# Altium PCB OmniCore_SDR.PcbDoc (part 10 of 13)
Units mil, origin at the board's own origin, x right, y up, seen from the top; angles counter-clockwise.
Board outline 4724.72 x 2755.91 mil, 8 copper layers (Top, GND 1, Layer 1, Layer 2, GND 2, Layer 3, Power, Bottom), stack 40.468 mil thick; 530 components, 427 nets, 2315 pads, 1715 vias.
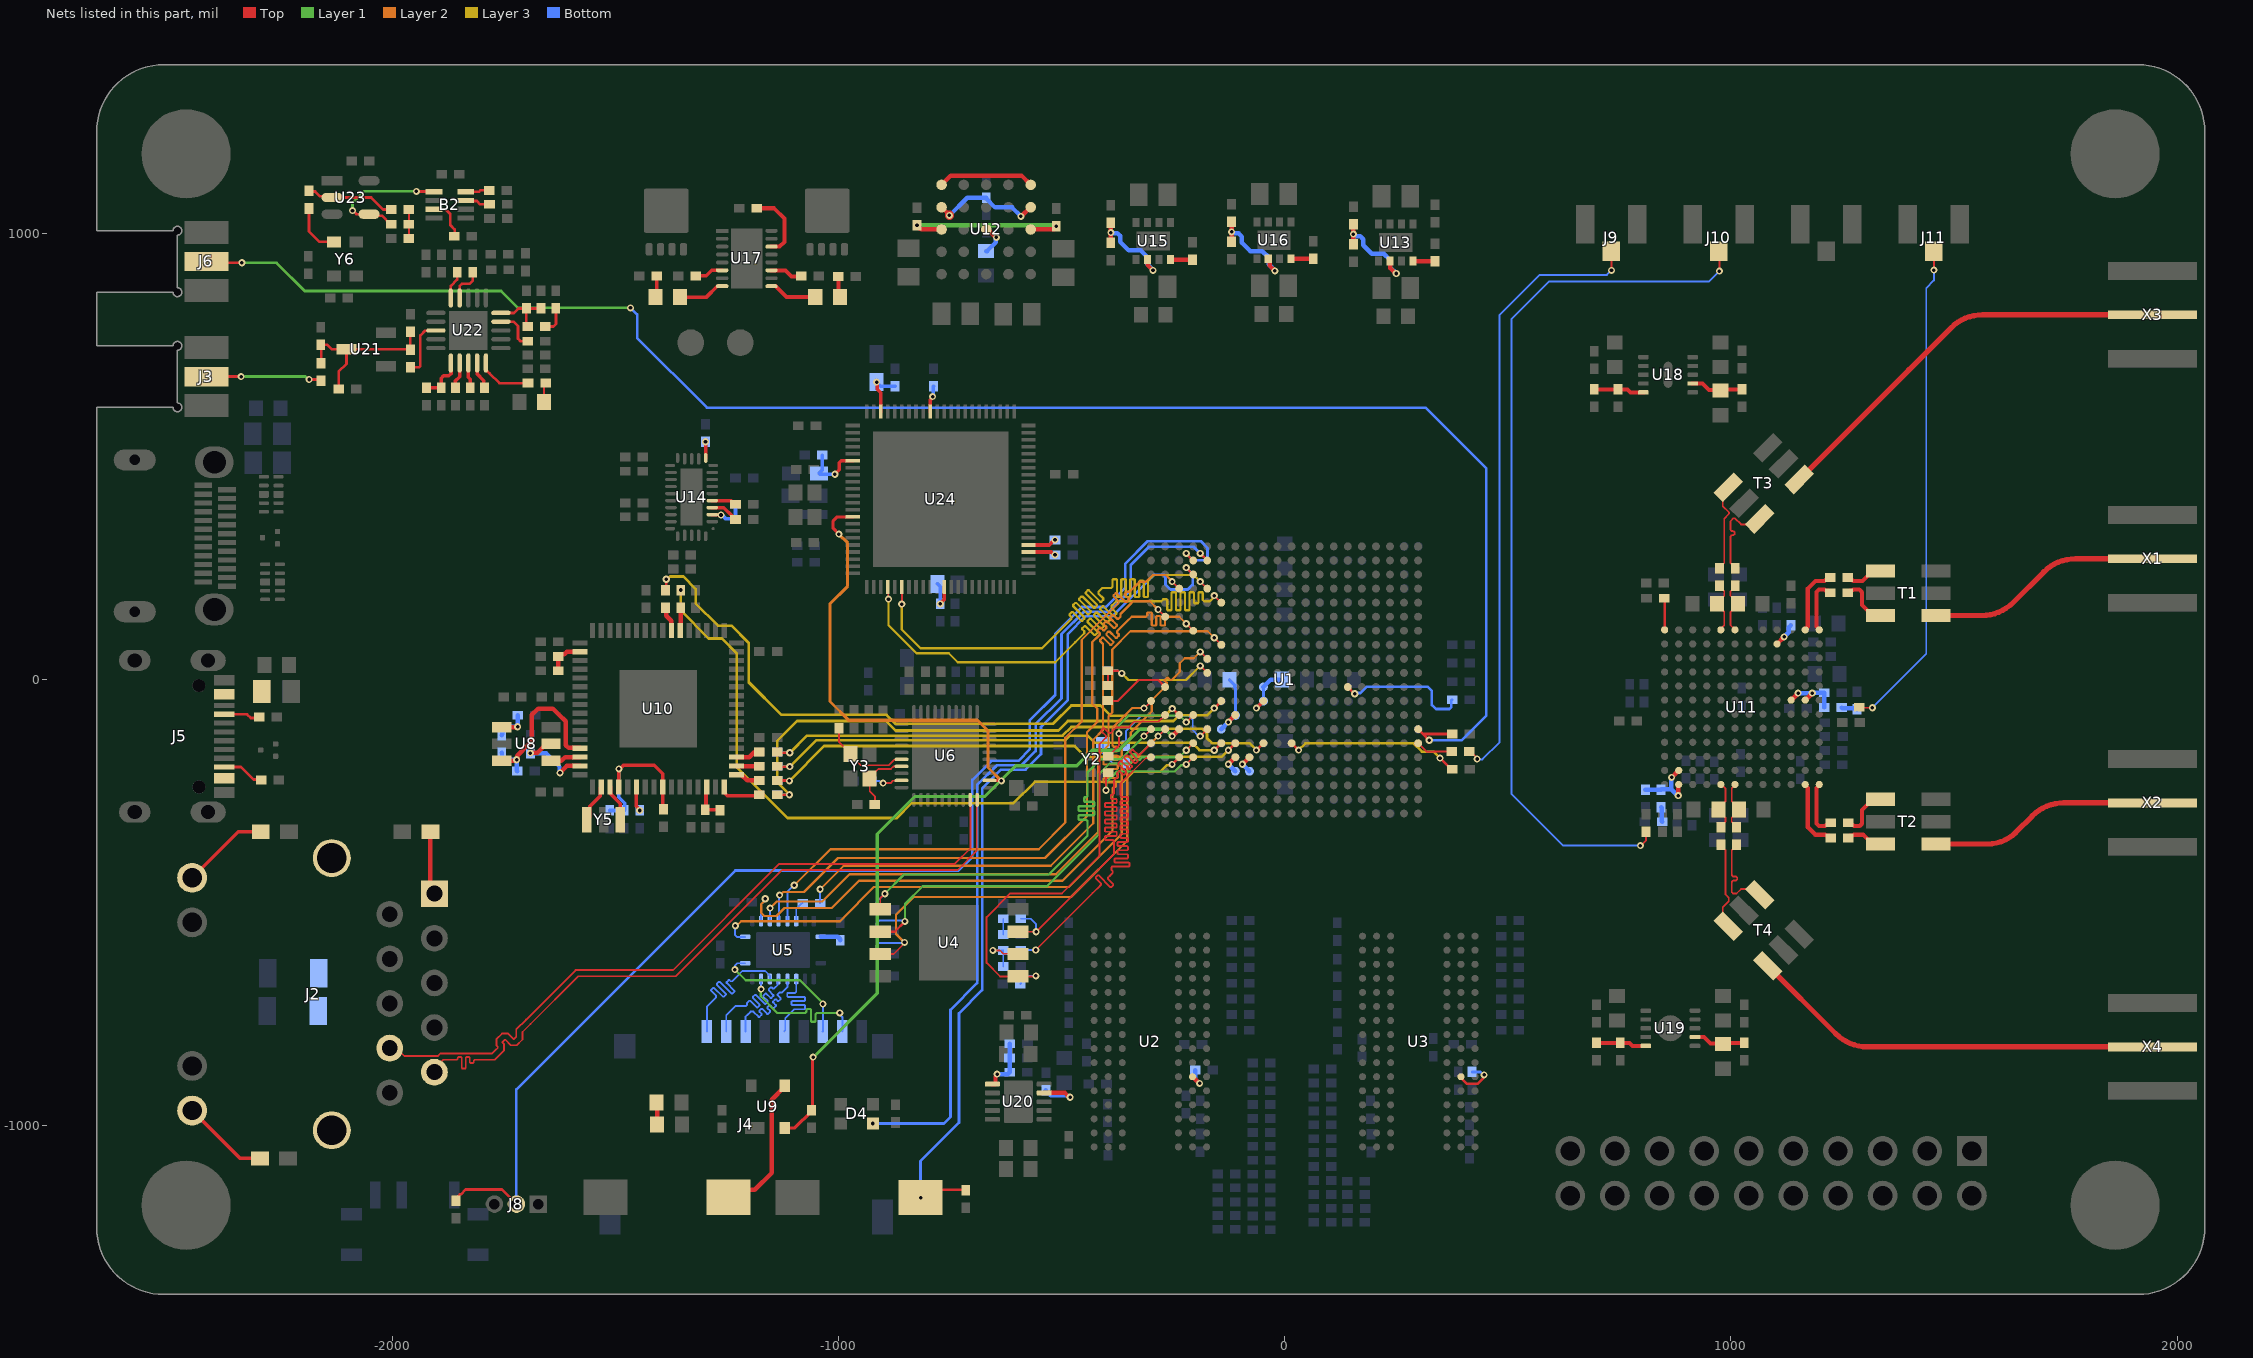
[diagram p15: the nets of this part, all layers, seen from the top]

## Via types
v1: diameter 16, hole 8, Top to Bottom, tented both sides, 1667 vias
v2: diameter 19.68, hole 7.87, Top to Bottom, 44 vias
v3: diameter 200, hole 125, Top to Bottom, 4 vias

## Nets (pads, with @x,y where several pads share a name; then routed paths per layer and width w, separated by ;. In a path a pad name is that pad's centre, name@x,y a point inside that pad or via, vN(x,y) a via of type N, cw(c..) or ccw(c..) an arc to the next point about the centre after c; other vN are vias at no path point) (continued)
MDI3_N: J2.9 U6.10 | length 1646
  Top w4: J2.9@-1905.55,-879.8 -1905.55,-871.4 -1885.95,-851.8 -1871,-851.8 -1857.5,-851.8 -1855.5,-851.8 -1853.15,-849.46 -1853.15,-847.15 -1851.8,-845.8 -1845.5,-845.8 -1844.15,-847.15 -1844.15,-870.45 -1842.8,-871.8 -1836.5,-871.8 -1835.15,-870.45 -1835.15,-847.15 -1833.8,-845.8 -1827.5,-845.8 -1826.15,-847.15 -1826.15,-857.94 -1824.8,-859.29 -1818.5,-859.29 -1817.15,-857.94 -1817.15,-854.14 -1814.81,-851.8 -1795.62,-851.8 -1770,-851.8 -1758.1,-839.9 -1749.69,-831.48 -1749.69,-816.57 -1752.58,-813.68 -1752.58,-811.77 -1748.12,-807.32 -1746.21,-807.32 -1734.21,-819.32 -1720.7,-819.32 -1708.05,-806.67 -1708.05,-793.16 -1708.05,-789.85 -1690.1,-771.9 -1583.2,-665 -1365,-665 -1127,-427 -733.2,-427 -690,-383.8 -690,-284.85 -689.84,-284.69 -689.84,-270.14 U6.10@-689.1,-269.4
MDI3_P: J2.8 U6.9 | length 1646.3
  Top w4: J2.8@-2005.55,-825.9 -1990.43,-825.9 -1972.53,-843.8 -1897.75,-843.8 -1891.75,-837.8 -1775.8,-837.8 -1768,-830 -1763.69,-825.69 -1763.69,-822.37 -1766.58,-819.48 -1766.58,-805.97 -1753.92,-793.32 -1740.41,-793.32 -1728.41,-805.32 -1726.5,-805.32 -1722.05,-800.87 -1722.05,-798.96 -1722.05,-784.05 -1700,-762 -1589,-651 -1370.8,-651 -1132.8,-413 -739,-413 -704,-378 -704,-284.85 -704.16,-284.69 -704.16,-270.14 U6.9@-704.9,-269.4
MIO7: R17.1 U1.D8 | length 267.4
  Top w4.2: R17.1@-395.32,-172 -371.39,-148.08 v1(-371.39,-121.07) ; v1(-220.72,-95.28) U1.D8@-204.97,-79.53
  Layer 1 w5: v1(-371.39,-121.07) -371.39,-102.39 -349.78,-80.78 -235.22,-80.78 v1(-220.72,-95.28)
MIO8: R9.1 U1.D5 | length 277.4
  Top w4.2: v1(-400.39,-248) -400.39,-214.08 R9.1@-395.32,-209 ; v1(-220.72,-190) -220.72,-189.88 -204.97,-174.13 U1.D5@-204.97,-174.02
  Layer 1 w5: v1(-400.39,-248) -400,-247.61 -400,-230.34 -375.66,-206 -246.43,-206 -232.54,-192.1 -222.82,-192.1 v1(-220.72,-190)
NetB2_1: B2.1 R138.2 U23.4 | length 310.5
  Top w4.2: v1(-1946,1094) v1@-1945.7,1093.7 ; B2.1@-1906.51,1093.7 B2.1@-1906.21,1093.4
  Top w6: v1(-2089,1051) -2087.98,1051 -2079.92,1042.94 U23.4@-2051.99,1042.94 -2048.78,1039.74 -2023.39,1039.74 -2004,1020.35 R138.2@-2002.03,1020.35 ; v1@-1945.7,1093.7 B2.1@-1906.51,1093.7
  Layer 1 w6: v1(-2089,1051) -2089,1068 -2063,1094 v1(-1946,1094)
NetB2_3: B2.3 R142.1 | length 94.9
  Top w6: B2.3@-1906.21,1054.03 -1881.03,1054.03 -1870,1043 -1870,1019 -1860,1009 -1860,994.06 R142.1@-1860.72,993.35
NetB2_7: B2.7 R141.2 | length 57.1
  Top w6: B2.7@-1835.35,1073.72 -1833.98,1072.35 -1810.35,1072.35 -1803,1065 -1782.38,1065 R141.2@-1782.03,1065.35
NetB2_8: B2.8 R140.2 | length 53.5
  Top w6: B2.8@-1835.35,1093.4 -1805.6,1093.4 -1802.65,1096.35 R140.2@-1783.03,1096.35
NetC4_2: C4.2 R6.2 R7.2 U1.E11 | length 317.4
  Top w4.2: v1(-189.22,30.71) U1.E11@-173.47,14.96
  Top w5: R6.2@-396,-13 C4.2@-396,20 -373.98,20 -367.98,14 v1(-365,14)
  Layer 3 w5: v1(-365,14) -350,-1 -220.93,-1 v1(-189.22,30.71)
  Bottom w5: R7.2@-396,20 -373.98,20 -367.98,14 v1(-365,14)
NetC36_2: C36.2 C37.2 L1.1 U1.G8 | length 152.4
  Top w10: v1(-126.23,-95.28) U1.G8@-110.48,-79.53
  Bottom w7: L1.1@-124.04,-0.5 -111.79,-12.75 -111.79,-17.12 -110.1,-18.82 C36.2@-110.1,-80
  Bottom w10: C37.2@-142.1,-111 -142.03,-111 -126.3,-95.28 v1(-126.23,-95.28) -125.7,-95.28 -110.43,-80 C36.2@-110.1,-80
NetC38_2: C38.2 C39.2 L2.1 U1.J9 | length 125.1
  Top w10: v1(-63.24,-63.78) U1.J9@-47.49,-48.03
  Bottom w7: C39.2@-47.7,-16.6 -47.6,-16.7 -47.6,-47.92 C38.2@-47.5,-48
  Bottom w10: v1(-63.24,-63.78) C38.2@-47.5,-48 ; C39.2@-47.7,-16.6 -31.1,0 L2.1@-5.56,0
NetC58_1: C58.1 U6.37 Y3.1 | length 146.9
  Top w4.2: C58.1@-918.32,-280 -918.32,-261.68 -930,-250 -930,-220.03 -910.33,-200.36 -882.36,-200.36 -876.6,-194.6 U6.37@-858.4,-194.6
NetC61_2: C61.2 U6.36 Y3.3 | length 200.7
  Top w4.2: C61.2@-999,-108.69 -999,-139.21 -973.3,-164.91 Y3.3@-973.3,-166.88 -973.3,-168.85 -950.15,-192 -887,-192 -874.6,-179.6 -859.1,-179.6 U6.36@-858.4,-178.9
NetC135_1: C135.1 U24.49 | length 64.2
  Top w8: U24.49@-574.2,301.6 -527.56,301.6 -516.16,313 v1(-514.68,313)
NetC142_1: C142.1 J2.1 | length 142.5
  Top w10: C142.1@-1914.5,-341 -1914.5,-470.84 J2.1@-1905.55,-479.8
NetC149_1: C149.1 U24.48 | length 50.4
  Top w8: U24.48@-562.45,285.94 -523.22,285.94 -516.85,279.57 v1(-514.68,279.57)
NetC156_2: C156.2 C157.2 U24.34 | length 88.5
  Top w8: v1(-772,169.69) -772,170.65 -763.2,179.45 U24.34@-763.2,207.2
  Bottom w8: C157.2@-778,214.5 -772,208.5 v1(-772,169.69)
NetC158_1: C158.1 U24.79 | length 59.7
  Top w8: U24.79@-794.7,600.8 -794.7,626.14 -789,631.84 v1(-789,634)
  Bottom w8: v1(-789,634) -788,635 -788,656.32 C158.1@-787,657.32
NetC159_1: C159.1 C160.1 U24.86 | length 114.9
  Top w8: v1(-914.5,666.5) -912.97,664.97 -912.97,650.58 -904.9,642.5 U24.86@-904.9,600.8
  Bottom w8: v1(-914.5,666.5) -905.32,657.32 C159.1@-873.09,657.32
NetC164_2: C164.2 C169.2 U24.6 | length 142.5
  Top w8: v1(-1008,460) -998,470 -998,485.91 -993.31,490.6 U24.6@-967.9,490.6
  Bottom w8: C164.2@-1036,503 -1036,469.5 C169.2@-1043.5,462 -1041.5,460 v1(-1008,460)
NetC166_1: C166.1 R30.1 R59.2 U20.1 | length 124.8
  Top w10: U20.1@-655.07,-906.63 -648.57,-906.63 -648.06,-906.12 -648.06,-889.36 -644.31,-885.61 v1(-644.31,-883.99)
  Bottom w10: v1(-644.31,-883.99) -620.36,-883.99 C166.1@-616.37,-880 -616.03,-879.66 -616.03,-816.34 R30.1@-615.68,-816
NetC177_2: C177.2 R90.1 U10.50 | length 85.3
  Top w10: C177.2@-1627.65,20 R90.1@-1627.65,52 -1622.81,56.84 -1614.16,56.84 -1608.52,62.48 U10.50@-1578.73,62.48
NetC186_2: C186.2 R107.1 U10.14 | length 85.3
  Top w8: U10.14@-1295.27,-240.67 -1296.8,-242.2 -1296.8,-289.78 C186.2@-1298.34,-291.31 -1297.84,-291.81 -1265.84,-291.81 R107.1@-1265.34,-292.32
NetC196_2: C196.2 C197.1 R113.1 U10.4 U10.9 | length 358.2
  Top w8: U10.4@-1492.12,-240.67 -1492.06,-240.61 -1492.06,-200.06 v1(-1492,-200) -1489.84,-200 -1481.84,-192 -1413,-192 -1393.69,-211.31 U10.9@-1393.69,-240.67 -1393.69,-286.96 C197.1@-1393,-287.65
  Bottom w8: R113.1@-1512.34,-293.32 C196.2@-1480.34,-293.31 -1479,-291.98 -1479,-277 -1492,-264 v1(-1492,-200)
NetC199_1: C199.1 U11.M12 | length 71.6
  Top w4.2: C199.1@850.18,182.46 C199.1@851.51,181.13
  Top w6: U11.M12@851.51,111.44 C199.1@851.51,181.13
NetC200_2: C200.2 R116.2 | length 35.8
  Bottom w10: R116.2@1248.18,-62.54 1250.02,-64.39 1280.65,-64.39 C200.2@1282.5,-66.23
NetC201_2: C201.2 R116.1 U11.G2 U11.G3 | length 135.9
  Top w10: U11.G3@1134.98,-46.04 v1(1150.72,-30.29) ; U11.G2@1166.47,-46.04 v1(1182.22,-30.29)
  Bottom w10: v1(1150.72,-30.29) v1(1182.22,-30.29) 1182.59,-29.92 1208.44,-29.92 C201.2@1208.81,-29.54 R116.1@1208.81,-62.54
NetC202_2: C202.2 R117.2 | length 33.4
  Bottom w10: R117.2@843.5,-286.23 844.84,-287.57 844.84,-317.2 C202.2@846.18,-318.54
NetC203_2: C203.2 R117.1 U11.A11 U11.B11 | length 154.5
  Top w10: v1(867.26,-219.27) U11.B11@883.01,-203.52 ; v1(882,-260) 882.5,-259.5 882.5,-235.52 U11.A11@883.01,-235.02
  Bottom w10: C203.2@808.5,-246.86 R117.1@843.5,-246.86 844.45,-245.9 866.28,-245.9 880.38,-260 v1(882,-260) ; 866.11,-245.9 866.11,-220.42 v1(867.26,-219.27)
NetC233_1: C233.1 J2.15 J2.16 R145.2
NetC239_2: C239.2 U13.8 | length 49.8
  Top w10: U13.8@287.39,938.03 287.56,937.86 336.83,937.86 C239.2@337,937.69
NetC242_1: C242.1 U12.C3 | length 71.8
  Top w10: U12.C3@-669,1008.69 -665.31,1008.69 -648.78,992.15 -647.15,992.15 v1(-646,991)
  Bottom w10: C242.1@-669,960.24 -667.03,960.24 -647.15,980.13 -647.15,989.85 v1(-646,991)
NetC243_2: C243.2 C246.2 U12.A3 U12.E3 | length 434.3
  Top w10: v1(-824,1018.31) -824,1016.35 -819.16,1011.5 -817.19,1011.5 -814.37,1008.69 U12.A3@-769,1008.69 ; U12.E3@-569,1008.69 -519.63,1008.69 -518.81,1009.5 -516.84,1009.5 -512,1014.35 v1(-512,1016.31)
  Layer 1 w10: v1(-824,1018.31) -522.7,1018.31 -520.7,1016.31 v1(-512,1016.31)
NetC249_2: C249.2 U15.8 | length 49.8
  Top w10: U15.8@-256.17,941.35 -256,941.17 -206.73,941.17 C249.2@-206.56,941
NetC250_2: C250.2 U16.8 | length 49.8
  Top w10: U16.8@14.39,943.03 14.56,942.86 63.83,942.86 C250.2@64,942.69
NetC251_1: C251.1 U17.14 | length 156.9
  Top w9: C251.1@-1182.79,1056.27 -1144.27,1056.27 -1121,1033 -1121,981 -1131.61,970.39 -1149.88,970.39 U17.14@-1150,970.27
NetC252_1: C252.1 U17.11 | length 73.2
  Top w9: U17.11@-1150,917.12 -1119.12,917.12 -1105,903 -1084.43,903 C252.1@-1083.16,904.27
NetC255_2: C255.2 R84.1 U18.7 | length 118.4
  Top w9: U18.7@914.3,663.44 936.26,663.44 950.83,648.88 975.39,648.88 C255.2@976.77,647.49 979.9,650.62 R84.1@1024.77,650.62
NetC260_2: C260.2 R87.1 U19.7 | length 118.4
  Top w9: U19.7@919.51,-801.09 940.09,-801.09 954,-815 979.95,-815 C260.2@981.98,-817.04 985.11,-813.91 R87.1@1029.98,-813.91
NetC261_1: C261.1 U17.6 | length 64.6
  Top w8: C261.1@-1319.79,904.27 -1319.04,905.02 -1295.98,905.02 -1284.03,916.97 -1260.62,916.97 U17.6@-1260.48,917.12
NetC274_1: C274.1 J3.1 | length 263.8
  Top w6: J3.1@-2416.46,679.02 -2338.62,679.02 v1@-2338.54,679.09 ; v1@-2189.11,672.5 v1(-2186.4,672.5) -2162.18,672.5 C274.1@-2159.35,669.66
  Layer 1 w6: v1(-2338.62,679.09) -2194.91,679.09 -2188.32,672.5 v1(-2186.4,672.5)
NetC274_2: C274.2 C275.1 R108.2 R112.1 R114.1 U21.2 | length 383.9
  Top w6: C274.2@-2159.35,709.03 -2159.35,749.66 R112.1@-2160.35,750.66 -2145.66,750.66 -2135,740 -2102.49,740 U21.2@-2102.43,739.94 ; R108.2@-2120.03,651.35 -2120.03,689.97 -2102.43,707.57 U21.2@-2102.43,739.94 ; R114.1@-1959.35,779.66 C275.1@-1959.35,739.35 -1959.94,739.94 U21.2@-2102.43,739.94
NetC275_2: C275.2 U22.8 | length 131.1
  Top w6: C275.2@-1959.35,699.98 -1940.02,699.98 -1937,703 -1937,771 -1926,782 -1902.53,782 U22.8@-1902.18,782.35
NetC276_2: C276.2 R109.2 R115.2 U22.20 | length 136
  Top w6: U22.20@-1756.51,821.72 -1727.28,821.72 -1717.34,831.66 C276.2@-1699.35,831.66 ; R115.2@-1696.03,791.35 -1699.35,794.66 C276.2@-1699.35,831.66 ; R109.2@-1666.35,831.66 C276.2@-1699.35,831.66
NetC278_2: C278.2 U22.5 | length 63.4
  Top w6: U22.5@-1868.72,855.18 -1868.72,882.28 -1854.35,896.65 C278.2@-1854.35,912.66
NetC279_2: C279.2 U22.4 | length 79.7
  Top w6: U22.4@-1849.03,855.18 -1849.03,881.97 -1844,887 -1827,887 -1819.35,894.65 C279.2@-1819.35,912.66
NetC280_2: C280.2 R115.1 | length 60.8
  Top w6: R115.1@-1656.66,791.35 -1638.65,791.35 -1633,797 -1633,831.32 C280.2@-1633.35,831.66
NetC285_2: C285.2 R138.1 R139.1 | length 65
  Top w4.2: C285.2@-1962.66,988.35 R139.1@-1962.66,1053.35
NetC286_1: C286.1 Y6.3 | length 117.3
  Top w6: C286.1@-2186.35,1055.66 -2186.35,1004.35 -2163,981 -2131.2,981 Y6.3@-2130.35,980.15
NetC286_2: C286.2 R139.2 U23.2 | length 201.6
  Top w6: C286.2@-2186.35,1095.03 -2184.98,1093.66 -2172.66,1093.66 -2161.81,1082.81 -2137.16,1082.81 U23.2@-2134.7,1080.35 -2047.35,1080.35 -2020.35,1053.35 R139.2@-2002.03,1053.35
NetC290_1: C290.1 J10.1 | length 1993.4
  Top w4.2: v1(797,-372) 798.8,-372 809.5,-361.3 C290.1@809.5,-341.23 ; J10.1@972.96,959.68 974.1,958.53 v1(974.1,915.3)
  Bottom w4.2: v1(797,-372) 624,-372 508,-256 508,808 592,892 950.8,892 v1(974.1,915.3)
NetC291_1: C291.1 J11.1 | length 1109.6
  Top w4.2: C291.1@1287.69,-62 1288.68,-63 v1(1317,-63) ; J11.1@1454.67,959.68 1454.9,959.45 v1(1454.9,917.6)
  Bottom w4.2: v1(1317,-63) 1437.8,57.8 1437.8,877.4 1454.9,894.5 v1(1454.9,917.6)
NetD1_2: D1.2 R25.1 | length 48.4
  Top w10: D1.2@-1406.16,-997 R25.1@-1406.16,-948.6
NetD2_1: D2.1 R131.2 | length 47.3
  Top w9: R131.2@-1000.16,903.27 -1000.16,860.5 D2.1@-996.92,857.26
NetD2_2: D2.2 U17.9 | length 108.1
  Top w9: U17.9@-1150,881.69 -1140.72,881.69 -1116.3,857.26 D2.2@-1052.04,857.26
NetD3_1: D3.1 R134.2 | length 48.3
  Top w8: D3.1@-1410.03,857.27 -1406.79,860.51 R134.2@-1406.79,904.27
NetD3_2: D3.2 U17.8 | length 104.6
  Top w8: D3.2@-1354.91,857.27 -1295.73,857.27 -1271.46,881.54 -1260.62,881.54 U17.8@-1260.48,881.69
NetD5_1: D5.1 R111.2 | length 43.4
  Top w4.2: D5.1@-1659.79,622.34 -1659.79,660.9 R111.2@-1656.35,664.35
NetJ2_11: J2.11 R75.2 | length 196.7
  Top w8: J2.11@-2448.46,-444.17 -2345.28,-341 R75.2@-2294.5,-341
NetJ2_14: J2.14 R74.2 | length 196.4
  Top w8: J2.14@-2448.46,-965.83 -2341.28,-1073 R74.2@-2296.5,-1073
NetJ4_1: J4.1 U5.17 | length 388.5
  Bottom w4.2: J4.1@-1294.68,-788.56 -1294.68,-732.68 -1275.5,-713.5 -1274.01,-712.01 -1274.01,-708.54 -1285.44,-697.11 -1285.44,-695.16 -1280.89,-690.6 -1278.94,-690.6 -1258.72,-710.82 -1256.76,-710.82 -1252.21,-706.27 -1252.21,-704.32 -1272.43,-684.1 -1272.43,-682.15 -1267.88,-677.59 -1265.93,-677.59 -1239.59,-703.93 -1237.64,-703.93 -1233.09,-699.37 -1233.09,-697.42 -1250.71,-679.79 -1250.71,-677.84 -1246.16,-673.29 -1244.21,-673.29 -1241.49,-676.01 -1238.01,-676.01 -1230.5,-668.5 -1215.09,-653.09 -1164.56,-653.09 -1153.74,-663.91 U5.17@-1153.74,-671
NetJ4_2: J4.2 U5.16 | length 313.2
  Bottom w4.2: J4.2@-1251.37,-788.56 -1251.37,-752.37 -1230.09,-731.09 -1211.07,-731.09 -1207.02,-731.09 -1204.56,-728.63 -1204.56,-724.28 -1200.01,-719.72 -1198.06,-719.72 -1182.95,-734.82 -1181,-734.82 -1176.45,-730.27 -1176.45,-728.32 -1191.55,-713.22 -1191.55,-711.27 -1187,-706.71 -1185.04,-706.71 -1165.15,-726.6 -1163.2,-726.6 -1158.65,-722.05 -1158.65,-720.1 -1168.43,-710.32 -1168.43,-708.37 -1163.87,-703.81 -1161.92,-703.81 -1152.14,-713.59 -1150.19,-713.59 -1145.64,-709.04 -1145.64,-707.09 -1156.33,-696.39 -1156.33,-694.44 -1151.78,-689.89 -1149.83,-689.89 -1147.6,-692.12 -1144.12,-692.12 -1142,-690 -1136.47,-684.47 -1136.47,-673.41 U5.16@-1134.06,-671
NetJ4_3: J4.3 U5.15 | length 257.2
  Bottom w4.2: J4.3@-1208.06,-788.56 -1208.06,-755.06 -1203.62,-750.62 -1197,-744 -1190.79,-744 -1178.89,-755.89 -1176.94,-755.89 -1172.39,-751.34 -1172.39,-749.39 -1177.2,-744.57 -1177.2,-742.62 -1172.65,-738.07 -1170.7,-738.07 -1159.71,-749.06 -1157.76,-749.06 -1153.2,-744.5 -1153.2,-742.55 -1159.4,-736.35 -1159.4,-734.4 -1154.85,-729.85 -1152.9,-729.85 -1146.7,-736.05 -1144.74,-736.05 -1140.19,-731.5 -1140.19,-729.54 -1146.39,-723.34 -1146.39,-721.39 -1141.84,-716.84 -1139.89,-716.84 -1136.31,-720.42 -1134.36,-720.42 -1129.8,-715.86 -1129.8,-713.91 -1136.51,-707.21 -1136.51,-705.26 -1131.95,-700.7 -1130,-700.7 -1129.59,-701.11 -1126.11,-701.11 -1124.5,-699.5 -1114.37,-689.37 U5.15@-1114.37,-671
NetJ4_5: J4.5 U5.14 | length 263.6
  Bottom w4.2: J4.5@-1121.45,-788.56 -1119.13,-786.24 -1119.13,-759.13 -1116,-756 -1098.76,-738.76 -1076.07,-738.76 -1074.68,-737.38 -1074.68,-730.94 -1076.07,-729.56 -1103.52,-729.56 -1104.9,-728.18 -1104.9,-721.74 -1103.52,-720.36 -1076.07,-720.36 -1074.68,-718.98 -1074.68,-712.54 -1076.07,-711.16 -1113.3,-711.16 -1114.68,-709.78 -1114.68,-703.34 -1113.3,-701.96 -1097.15,-701.96 -1094.68,-699.5 -1094.68,-694 U5.14@-1094.68,-671
NetJ4_7: J4.7 U5.20 | length 326.1
  Layer 1 w5: v1(-1232,-650) -1208,-674 -1086,-674 -1035,-725 v1(-1035,-727)
  Bottom w4.2: v1(-1232,-650) -1232,-641 -1226.57,-635.57 U5.20@-1208.86,-635.57 ; J4.7@-1035,-788.39 v1(-1035,-727)
  Bottom w5: J4.7@-1035,-788.39 J4.7@-1034.83,-788.56
NetJ4_8: J4.8 U5.18 | length 326.2
  Layer 1 w5: v1(-1173.49,-693.49) -1174,-694 -1174,-709.94 -1136.94,-747 -1084,-747 -1074.36,-747 -1071.43,-744.07 -1071.43,-739.8 -1069.93,-738.3 -1062.93,-738.3 -1061.43,-739.8 -1061.43,-765.5 -1059.93,-767 -1052.93,-767 -1051.43,-765.5 -1051.43,-749.93 -1048.5,-747 -1046,-747 v1(-997,-747)
  Bottom w4.2: v1(-1173.49,-693.49) U5.18@-1173.46,-671.03 ; v1(-997,-747) -997,-750.19 -991,-756.19 -991,-788.03 J4.8@-991.53,-788.56
NetJ5_A4: J5.A4 J5.A9 J5.B4 J5.B9 L5.2
NetJ5_A5: J5.A5 R60.2 | length 82.9
  Top w6: J5.A5@-2376.41,-77.87 -2325.13,-77.87 -2317,-86 -2299.68,-86 R60.2@-2297.69,-84
NetJ5_B5: J5.B5 R61.2 | length 94.7
  Top w6: J5.B5@-2376.41,-195.98 -2339.02,-195.98 -2311,-224 -2294.69,-224 R61.2@-2293.69,-225
NetJ9_1: J9.1 R143.1 | length 1384.8
  Top w4.2: R143.1@413.69,-161 415.65,-161 431.2,-176.55 v1(431.2,-178) ; J9.1@732.1,959.68 732.1,917.3 v1(732.4,917)
  Bottom w4.2: v1(431.2,-178) 432.26,-179.06 443.04,-179.06 481.7,-140.4 481.7,817.2 571.3,906.8 722.2,906.8 v1(732.4,917)
NetR1_2: R1.2 U14.11 | length 36.6
  Top w8: v1(-1298,533) -1297.72,532.72 -1297.72,496.85 U14.11@-1297.5,496.64
NetR3_1: R3.1 Y2.3 | length 85
  Bottom w4.2: Y2.3@-407,-141 -407,-166 -385.32,-187.68 R3.1@-356,-187.68
NetR3_2: R3.2 U1.E7 | length 268
  Top w4.2: v1(-189.22,-126.77) U1.E7@-173.47,-111.02
  Bottom w4.2: R3.2@-356,-148.31 -356,-116.13 -321.05,-81.18 -214.88,-81.18 -206,-90.05 -206,-113 -192.23,-126.77 v1(-189.22,-126.77)
NetR5_2: R5.2 U1.B10 | length 154.4
  Top w5: R5.2@-396,-47 -395,-48 -374,-48 -327,-1 -283.5,-1 U1.B10@-267.96,-16.54
NetR8_2: R8.2 U1.A5 | length 994.4
  Top w4.2: v1(-558,-606) -430.27,-478.27 -413.5,-461.5 -412.01,-460.01 -412.01,-456.54 -423.44,-445.11 -423.44,-443.16 -418.89,-438.6 -416.94,-438.6 -390.6,-464.94 -388.65,-464.94 -384.1,-460.38 -384.1,-458.43 -395.52,-447 -395.52,-443.52 -392.43,-440.43 -389.36,-437.36 -388.4,-436.4 -385.23,-433.23 -385.23,-429.75 -388,-426.98 -388,-420.54 -386.62,-419.16 -349.38,-419.16 -348,-417.78 -348,-411.34 -349.38,-409.96 -379.78,-409.96 -381.16,-408.58 -381.16,-402.14 -379.78,-400.76 -352.54,-400.76 -351.16,-399.38 -351.16,-392.94 -352.54,-391.56 -373.32,-391.56 -374.7,-390.18 -374.7,-383.74 -373.32,-382.36 -352.88,-382.36 -351.5,-380.98 -351.5,-374.54 -352.88,-373.16 -373.32,-373.16 -374.7,-371.78 -374.7,-365.34 -373.32,-363.96 -352.88,-363.96 -351.5,-362.58 -351.5,-356.14 -352.88,-354.76 -366.62,-354.76 -368,-353.38 -368,-346.94 -366.62,-345.56 -352.88,-345.56 -351.5,-344.18 -351.5,-337.74 -352.88,-336.36 -366.62,-336.36 -368,-334.98 -368,-328.54 -366.62,-327.16 -352.88,-327.16 -351.5,-325.78 -351.5,-319.34 -352.88,-317.96 -366.62,-317.96 -368,-316.58 -368,-310.14 -366.62,-308.76 -352.88,-308.76 -351.5,-307.38 -351.5,-300.94 -352.88,-299.56 -366.62,-299.56 -368,-298.18 -368,-291.74 -366.62,-290.36 -352.88,-290.36 -351.5,-288.98 -351.5,-282.54 -352.88,-281.16 -366.62,-281.16 -368,-279.78 -368,-273.34 -366.62,-271.96 -352.88,-271.96 -351.5,-270.58 -351.5,-264.14 -352.88,-262.76 -365.54,-262.76 -368,-260.3 -368,-243 -368,-233 -310.75,-175.75 -301.2,-175.75 U1.A5@-299.46,-174.02
  Bottom w4.2: R8.2@-591.31,-607 -590.31,-606 v1(-558,-606)
NetR11_1: R11.1 U14.4 | length 64.1
  Top w8: U14.4@-1282.72,385.38 -1282.51,385.17 -1256.85,385.17 -1238.5,366.81 -1238.5,364.84 -1232.65,359 R11.1@-1230.68,359
NetR12_1: R12.1 U14.5 | length 55.4
  Top w8: U14.5@-1282.72,401.13 -1240.78,401.13 -1232.65,393 R12.1@-1230.68,393
NetR18_1: R18.1 R20.1 | length 35
  Bottom w4.2: R18.1@-630.68,-571 R20.1@-630.68,-536
NetR21_1: R21.1 U1.R10 | length 302.9
  Top w4.2: U1.R10@141.49,-16.54 U1.R10@141.66,-16.54 ; v1@156.93,-31.8 v1(157.1,-31.8)
  Top w6: U1.R10@141.66,-16.54 v1@156.93,-31.8
  Bottom w6: v1(157.1,-31.8) 158.84,-30.06 169.94,-30.06 184,-16 320,-16 329.77,-25.77 329.77,-56.77 339,-66 369,-66 373.35,-61.65 373.35,-46.97 R21.1@375.31,-45
NetR22_1: R22.1 U1.L6 | length 396.5
  Top w4.2: U1.L6@15.5,-142.52 U1.L6@15.64,-142.52 ; v1@31.12,-158 v1(31.25,-158) ; v1(348,-176) v1@348.35,-176 ; R22.1@373.35,-201 R22.1@375.31,-201
  Top w6: U1.L6@15.64,-142.52 v1@31.12,-158 ; v1@348.35,-176 R22.1@373.35,-201
  Layer 3 w6: v1(31.25,-158) 46.25,-143 289.17,-143 307.55,-161.39 333.39,-161.39 v1(348,-176)
NetR26_2: R26.2 U1.D14 | length 1530.7
  Top w4.2: v1(-220.72,125.2) U1.D14@-204.97,109.45
  Layer 2 w5: v1(-1041,-470) -988,-417 -524,-417 -429,-322 -429,-135 -407,-113 -407,72.07 -407,79.75 -413.7,86.45 -413.7,88.57 -408.75,93.52 -406.63,93.52 -390.98,77.87 -388.86,77.87 -383.91,82.82 -383.91,84.94 -399.56,100.59 -399.56,102.71 -394.61,107.66 -392.49,107.66 -378.61,93.78 -376.49,93.78 -371.54,98.73 -371.54,100.86 -375.27,104.59 -375.27,108.73 -352,132 -343,141 -313.49,141 -310.99,141 -308.06,143.93 -308.06,149.04 -306.56,150.54 -299.56,150.54 -298.06,149.04 -298.06,122.5 -296.56,121 -289.56,121 -288.06,122.5 -288.06,140.69 -286.56,142.19 -279.56,142.19 -278.06,140.69 -278.06,122.5 -276.56,121 -269.56,121 -268.06,122.5 -268.06,138.07 -265.14,141 -259,141 -236.52,141 v1(-220.72,125.2)
  Bottom w4.2: R26.2@-1041,-501 v1(-1041,-470)
NetR27_2: R27.2 U1.H5 | length 44.6
  Top w10: v1(-94.73,-189.76) U1.H5@-78.98,-174.02
  Bottom w10: v1(-94.73,-189.76) -94.63,-189.76 -79,-205.4 R27.2@-78.9,-205.4
NetR28_2: R28.2 U1.G5 | length 44.6
  Top w10: v1(-126.23,-189.76) U1.G5@-110.48,-174.02
  Bottom w10: v1(-126.23,-189.76) R28.2@-110.4,-205.5
NetR29_1: R29.1 U20.9 | length 123.4
  Top w10: U20.9@-538.93,-926.31 -492.31,-926.31 -482.62,-936 v1(-481,-936)
  Bottom w10: R29.1@-535,-920.68 -535,-922.65 -530.16,-927.5 -528.19,-927.5 -524.36,-931.32 -487.3,-931.32 -482.62,-936 v1(-481,-936)
NetR55_1: R55.1 U2.L8 | length 56
  Top w10: U2.L8@-206.5,-889.96 -206.12,-889.96 -191.14,-904.93 v1(-190.76,-904.93)
  Bottom w10: R55.1@-200.68,-875 -200.68,-895 v1(-190.76,-904.93)
NetR56_1: R56.1 U3.L8 | length 101.2
  Top w6: U3.L8@394.99,-889.96 394.99,-892.41 408.58,-906 432.43,-906 445.09,-893.34 445.09,-887.91 v1@446.89,-886.11
  Bottom w6: R56.1@420,-879.32 438.84,-879.32 445.53,-886 v1(447,-886)
NetR69_1: R69.1 U5.10 | length 47.5
  Bottom w10: U5.10@-1039.57,-576.51 -1001.46,-576.51 -996.21,-581.76 R69.1@-996.21,-583.72
NetR71_1: R71.1 U6.39 | length 72.4
  Top w4.2: v1(-900,-232) -883.06,-232 -877.86,-226.8 -859.1,-226.8 U6.39@-858.4,-226.1
  Bottom w4.2: R71.1@-926.32,-227 -908.19,-227 -903.19,-232 v1(-900,-232)
NetR76_2: R76.2 R85.1 U18.5 | length 113.1
  Top w9: R76.2@693.77,650.62 768.18,650.62 775.04,643.76 U18.5@804.06,643.76
NetR80_2: R80.2 U14.3 | length 86.3
  Top w8: U14.3@-1282.72,369.63 -1282.51,369.42 -1263.73,369.42 v1(-1263.16,368.84)
  Bottom w8: v1(-1263.16,368.84) -1260.99,368.84 -1252.15,360 -1235.37,360 -1230.69,364.69 R80.2@-1230.69,393
NetR86_2: R86.2 R100.1 U19.5 | length 113.1
  Top w9: R100.1@698.98,-813.91 R86.2@751.98,-813.91 772.91,-813.91 779.77,-820.77 U19.5@809.28,-820.77
NetR91_2: R91.2 U10.16 | length 95.2
  Top w8: U10.16@-1255.9,-240.67 -1253.99,-242.57 -1253.99,-255.31 -1249.31,-260 -1179.02,-260 R91.2@-1177.02,-258
NetR92_2: R92.2 U10.17 | length 56.7
  Top w10: U10.17@-1228.34,-213.11 -1217.51,-213.11 -1204.62,-226 R92.2@-1177.02,-226
NetR93_2: R93.2 U10.18 | length 51.6
  Top w10: U10.18@-1228.34,-193.43 -1228.05,-193.71 -1177.31,-193.71 R93.2@-1177.02,-194
NetR94_2: R94.2 U10.19 | length 56.2
  Top w10: U10.19@-1228.34,-173.74 -1199.74,-173.74 -1189,-163 -1178.02,-163 R94.2@-1177.02,-162
NetR99_1: R99.1 R103.1 U8.3 U10.61 | length 403.2
  Top w10: U8.3@-1754.46,-181.4 -1722.88,-181.4 -1720.1,-178.63 -1720.1,-170.4 -1693.7,-144 -1692.86,-144 -1687,-138.14 -1687,-79 -1673,-65 -1639.96,-65 -1626.93,-78.03 -1626.6,-78.03 -1611,-93.63 -1611,-147 -1604.85,-153.15 -1579.64,-153.15 U10.61@-1578.73,-154.06
  Bottom w10: R99.1@-1754.46,-163.68 -1754,-164.14 -1754,-174.14 -1748.14,-180 -1721.47,-180 v1(-1721.25,-179.77) -1720.64,-180.39 -1720.64,-204.39 R103.1@-1720.02,-205
NetR99_2: R99.2 R102.1 U8.1 | length 111.2
  Top w10: U8.1@-1754.46,-106.6 -1720.16,-106.6 v1(-1719.12,-105.56)
  Bottom w10: R99.2@-1754.46,-124.31 -1753,-122.86 -1753,-111.41 -1747.14,-105.56 v1(-1719.12,-105.56) -1719.07,-105.51 -1719.07,-80.05 R102.1@-1719.02,-80
NetR104_1: R104.1 U8.5 U10.63 | length 198.7
  Top w10: v1(-1690.34,-164.68) -1689.19,-163.54 -1673.6,-163.54 -1654.06,-144 U8.5@-1644.22,-144 ; v1(-1624,-209) -1608.43,-193.43 U10.63@-1578.73,-193.43
  Bottom w10: v1(-1690.34,-164.68) -1655.32,-164.68 -1625.15,-194.85 -1625.15,-207.85 v1(-1624,-209)
NetR105_2: R105.2 U10.38 | length 52
  Top w10: U10.38@-1354.32,109.72 -1353.83,110.22 -1353.83,160.82 R105.2@-1353.34,161.31
NetR106_2: R106.2 U10.39 | length 57.1
  Top w10: R106.2@-1387.34,161.31 -1386,159.98 -1386,143 -1374.91,131.91 -1374.91,110.63 U10.39@-1374.01,109.72
NetR110_2: R110.2 U10.6 | length 55.7
  Top w8: U10.6@-1452.75,-240.67 -1452.75,-283.74 -1445.34,-291.15 v1(-1445.34,-293.31)
NetR111_1: R111.1 U22.15 | length 121.9
  Top w6: U22.15@-1789.98,709.51 -1789.98,694.31 -1781.67,686 -1760.02,664.35 R111.1@-1695.72,664.35
NetR118_1: R118.1 U11.L4 | length 54.7
  Top w10: U11.L4@1103.48,79.94 v1(1119.23,95.69)
  Bottom w10: v1(1119.23,95.69) 1129.65,106.12 1129.65,116.93 R118.1@1134.5,121.77
NetR122_1: R122.1 R124.2 U13.6 | length 227.3
  Top w10: R122.1@154,976.06 v1(154,998.37) R124.2@154,1020.69 ; U13.6@236.2,938.03 237,937.24 237,922 249.02,909.98 v1(249.98,909.98)
  Bottom w10: v1(154,998.37) v1@155.15,997.22 ; v1@155.5,993.89 169.06,993.89 176.06,986.88 176.06,973.33 195.19,954.2 222.06,954.2 236.06,940.2 236.06,924.75 249.98,910.83 v1(249.98,909.98)
NetR125_2: R125.2 U22.12 | length 59.3
  Top w8: R125.2@-1858.32,654.06 -1858.32,669.68 -1849.03,678.97 U22.12@-1849.03,709.51
NetR126_2: R126.2 U12.A4 U12.E4 | length 251.8
  Top w10: U12.A4@-769,1058.69 v1@-751.35,1041.04 ; v1(-591,1038) -590.34,1038 -569.66,1058.69 U12.E4@-569,1058.69
  Top w20: v1(-751.35,1040.13) v1@-751.35,1041.04
  Bottom w10: v1(-751.35,1040.13) -711.49,1080 R126.2@-669,1080 -669,1078.03 -648.97,1058 -611,1058 v1(-591,1038)
NetR127_1: R127.1 R129.2 U15.6 | length 221.6
  Top w10: R127.1@-389.56,979.37 v1(-389.56,1001.69) R129.2@-389.56,1024 ; U15.6@-307.35,941.35 -307.35,929.28 v1(-295.06,916.99)
  Bottom w10: v1(-389.56,1001.69) -388.41,1000.54 -374.86,1000.54 -369,994.68 -369,981.13 -349.87,962 -323,962 -309,948 -309,932.55 -295.06,918.61 v1(-295.06,916.99)
NetR128_1: R128.1 R130.2 U16.6 | length 229.3
  Top w10: R128.1@-119,981.06 v1(-119,1003.37) R130.2@-119,1025.69 ; U16.6@-36.8,943.03 -33.92,940.16 -33.92,927.92 v1(-22,916)
  Bottom w10: v1(-119,1003.37) -115.52,999.89 -102.94,999.89 -95.94,992.88 -95.94,979.33 -76.81,960.2 -49.94,960.2 -35.94,946.2 -35.94,930.75 -22,916.81 v1(-22,916) v1@-22,915.19
NetR132_2: R132.2 U22.13 | length 57.1
  Top w8: U22.13@-1829.35,709.51 -1829.35,677.35 -1825.35,673.35 R132.2@-1825.35,654.03
NetR133_2: R133.2 U22.14 | length 62.2
  Top w8: U22.14@-1809.66,709.51 -1809.66,684.66 -1794.68,669.68 -1794.68,655.37 R133.2@-1793.35,654.03
NetR135_1: R135.1 U22.19 | length 94.7
  Top w6: U22.19@-1756.51,802.03 -1728.03,802.03 -1718,792 -1718,764 -1713.98,759.98 -1712.35,758.35 R135.1@-1696.35,758.35
NetR136_2: R136.2 R137.2 U22.11 | length 105.1
  Top w8: R136.2@-1923.35,654.03 R137.2@-1890.35,654.03 -1890.35,675.65 -1885,681 -1873,681 -1868,686 -1868,708.8 U22.11@-1868.72,709.51
NetS2_1: S2.1 U9.3 | length 325.9
  Top w10: S2.1@-1246,-1160 -1229.45,-1143.45 -1187.65,-1143.45 -1149.8,-1105.6 -1149.8,-941.53 -1120.7,-912.43 U9.3@-1120.7,-910.46
NetT1_3: T1.3 X1.1 | length 529
  Top w12: T1.3@1460.08,143.46 1562.04,143.46 ccw(c1562.04,243.46) 1632.75,172.75 1701.43,241.43 cw(c1772.14,170.72) 1772.14,270.72 X1.1@1945,270.72
NetT2_3: T2.3 X2.1 | length 515
  Top w12: T2.3@1460.09,-368.54 1574.92,-368.54 ccw(c1574.92,-277.92) 1639,-342 1675.57,-305.43 cw(c1746.28,-376.14) 1746.28,-276.14 X2.1@1945,-276.14
NetT3_3: T3.3 X3.1 | length 940.1
  Top w12: T3.3@1153.38,448.63 1398.75,694 1399,694 1493.29,788.29 cw(c1564,717.57) 1564,817.57 X3.1@1945,817.57
NetT4_3: T4.3 X4.1 | length 933.6
  Top w12: T4.3@1082.4,-641.16 1234.95,-793.71 ccw(c1305.66,-723) 1305.66,-823 X4.1@1945,-823
NetU8_4: U8.4 U10.62 | length 69.2
  Top w10: U8.4@-1644.22,-181.4 -1643.62,-182 -1621,-182 -1612.74,-173.74 U10.62@-1578.73,-173.74
NetU10_2: U10.2 Y5.3 | length 86.7
  Top w8: Y5.3@-1563.74,-314 -1556.91,-307.17 -1556.91,-283.72 -1533.39,-260.2 -1533.39,-242.57 U10.2@-1531.49,-240.67
NetU10_3: U10.3 Y5.1 | length 82.8
  Top w8: U10.3@-1511.8,-240.67 -1509.9,-242.57 -1509.9,-257.1 -1488.94,-278.06 Y5.1@-1488.94,-314
NetU12_A5: U12.A5 U12.E5 | length 217.2
  Top w10: U12.A5@-769,1108.69 -748.19,1129.5 -589.81,1129.5 U12.E5@-569,1108.69
PL_FAN_CONTRL: J8.2 R14.2 U1.D19 | length 2836.3
  Top w6: R14.2@-1855.1,-1162.51 -1855.1,-1160.55 -1848.26,-1153.7 -1846.29,-1153.7 -1835.39,-1142.8 -1754.31,-1142.8 J8.2@-1721.71,-1175.4 ; J8.2@-1714.51,-1168.2 J8.2@-1709.31,-1173.4 ; v1(-220.72,282.68) U1.D19@-204.97,266.93
  Bottom w6: J8.2@-1721.71,-1175.4 -1721.71,-918.71 -1231,-428 -731,-428 -700,-397 -700,-225 -657,-182 -597,-182 -571,-156 -571,-91 -514,-34 -514,103 -454.5,162.5 -400.5,162.5 -357.5,205.5 -357.5,259.5 -307,310 -188,310 -173,295 -173,271.19 -176.51,267.68 -205.72,267.68 v1(-220.72,282.68)
PL_KEY: R13.2 S1.1 U1.D18 | length 1971.5
  Top w4.2: v1(-220.72,251.07) v1(-220.72,251.07) ; U1.D18@-204.97,235.43 U1.D18@-204.97,235.43
  Top w6: v1(-816,-1161) -798,-1143 -716.01,-1143 R13.2@-714.7,-1144.31 ; v1(-220.72,251.07) U1.D18@-204.97,235.43
  Bottom w6: v1(-816,-1161) -816,-1079 -730,-993 -730,-748 -678,-696 -678,-244 -636,-202 -581,-202 -546,-167 -546,-106 -486,-46 -486,101.86 -445.86,142 -386,142 -293.32,234.68 -271.41,234.68 -267.21,230.49 -267.21,213.47 -255.74,202 -217.19,202 -207.19,212 -205.72,212 -205.72,236.07 v1(-220.72,251.07)
PL_RGB: D4.3 U1.E19 | length 1850.6
  Top w6: v1(-189.22,282.68) U1.E19@-173.47,266.93
  Bottom w6: v1(-922.78,-994.75) -763.35,-994.75 -749,-980.4 -749,-740 -689,-680 -689,-236 -645,-192 -590,-192 -558,-160 -558,-100 -500,-42 -500,102 -450,152 -394,152 -345,201 -345,257 -304.32,297.68 -204.22,297.68 v1(-189.22,282.68)
PPS_EXT: J6.1 R144.2 U1.Y7 | length 3896
  Top w6: J6.1@-2413.45,934 v1(-2337,934) ; U1.Y7@298.97,-111.02 309.97,-122 ; v1(324,-136) 309.97,-122 ; R144.2@375.31,-122 309.97,-122
  Top w10: J6.1@-2416.46,937.01 J6.1@-2413.45,934
  Layer 1 w6: v1(-2337,934) -2259,934 -2196,871 -1756,871 -1718,833 v1(-1466,833)
  Bottom w6: v1(-1466,833) -1451,818 -1451,766 -1294.54,609.54 315.46,609.54 452,473 452,-80 396,-136 v1(324,-136)
PS_POR#: R4.2 U1.C7 U6.12 U9.2 U24.14 | length 2561.1
  Top w7: U9.2@-1120.7,-1004.94 -1100.44,-1004.94 -1100.2,-1004.7 -1097.82,-1004.7 -1060.1,-966.98 R4.2@-1060.1,-965.01 -1058.5,-963.41 -1058.5,-847.6 v1(-1056.9,-846) ; v1(-999,326) -999,326.12 -1012.02,339.14 -1012.02,355.69 -1002.94,364.77 -968.07,364.77 U24.14@-967.9,364.6 ; U6.12@-661.6,-226.1 -661.43,-226.27 -635.73,-226.27 v1(-635,-227)
  Top w10: v1(-252.21,-126.77) U1.C7@-236.46,-111.02
  Layer 1 w7: v1(-1056.9,-846) -1055.8,-846 -913,-703.2 -913,-346 -829,-262 -671.92,-262 -626.65,-216.73 -626.65,-216.65 -603,-193 -466.08,-193 -447.84,-174.76 -431.58,-158.5 -371.5,-158.5 -324.27,-111.27 -267.71,-111.27 v1(-252.21,-126.77)
  Layer 2 w7: v1(-999,326) -979.5,306.5 -979.5,209.5 -1019,170 -1019,-49 -976.9,-91.1 -688.4,-91.1 -665,-114.5 -665,-197 v1(-635,-227)
QSPI_CLK: R8.1 R16.1 U4.6 | length 119.9
  Top w4.2: v1(-654,-607) -638,-607 -630.5,-614.5 U4.6@-597.2,-614.5
  Top w10: U4.6@-597.7,-615 U4.6@-597.2,-614.5
  Bottom w4.2: v1(-654,-607) R8.1@-630.68,-607 R16.1@-630.68,-643
QSPI_CS: R63.1 U1.A7 U4.1 | length 1059.2
  Top w4.2: U4.1@-906.4,-515 -906.4,-490.4 v1(-896,-480) ; v1(-315.2,-126.77) U1.A7@-299.46,-111.02
  Layer 1 w5: v1(-896,-480) -853,-437 -529,-437 -442,-350 -442,-319.28 -442,-316.78 -444.93,-313.86 -460.5,-313.86 -462,-312.36 -462,-305.36 -460.5,-303.86 -427.95,-303.86 -426.45,-302.36 -426.45,-295.36 -427.95,-293.86 -460.5,-293.86 -462,-292.36 -462,-285.36 -460.5,-283.86 -427.95,-283.86 -426.45,-282.36 -426.45,-275.36 -427.95,-273.86 -447.84,-273.86 -449.34,-272.36 -449.34,-265.36 -447.84,-263.86 -444.93,-263.86 -442,-260.93 -442,-224 -442,-208 -412.78,-178.78 -367.22,-178.78 v1(-315.2,-126.77)
  Bottom w4.2: R63.1@-914.37,-515 -914.37,-498.37 v1(-896,-480)
QSPI_IO_0: R10.1 U1.B8 U4.5 | length 1044
  Top w4.2: v1(-557.43,-663.93) -558.5,-665 U4.5@-597.7,-665 -638,-665 -668.1,-634.9 -668.1,-532.1 -615,-479 -499,-479 -415,-395 -415,-144.74 -401.66,-131.4 -400.17,-129.91 -400.17,-126.43 -410.92,-115.68 -410.92,-113.73 -406.37,-109.18 -404.42,-109.18 -393.67,-119.93 -390.19,-119.93 -381.43,-111.17 -377.23,-106.97 -349.03,-106.97 -336.6,-94.54 -282.98,-94.54 U1.B8@-267.96,-79.53
  Bottom w4.2: R10.1@-592.32,-682 -591,-680.68 -591,-668 -586.93,-663.93 v1(-557.43,-663.93)
QSPI_IO_1: R15.1 U1.D6 U4.2 | length 1087.9
  Top w4.2: v1(-220.72,-158.27) U1.D6@-204.97,-142.52
  Top w5: U4.2@-906.4,-565 -874,-565 v1(-851,-542)
  Layer 1 w5: v1(-851,-542) -851,-503 -811,-463 -532.43,-463 -417.45,-348.01 -417.45,-213.45 -391.78,-187.78 -346.78,-187.78 -345.53,-186.53 -343.03,-184.03 -343.03,-168.83 -341.53,-167.33 -334.53,-167.33 -333.03,-168.83 -333.03,-178.16 -331.53,-179.66 -324.53,-179.66 -323.03,-178.16 -323.03,-176.93 -320.1,-174 -255,-174 -236.45,-174 v1(-220.72,-158.27)
  Bottom w4.2: R15.1@-915.37,-563 -915.37,-546.37 -909,-540 -853,-540 v1(-851,-542)
QSPI_IO_2: R23.2 U1.B7 U4.3 | length 1093.2
  Top w4.2: U4.3@-906.4,-615 -876,-615 -852,-591 v1(-852,-589) ; v1(-283.71,-126.77) U1.B7@-267.96,-111.02
  Layer 2 w5: v1(-852,-589) -871,-570 -871,-527 -831,-487 -479,-487 -353,-361 -353,-196.06 v1(-283.71,-126.77)
  Bottom w4.2: R23.2@-915.37,-615 -915.37,-596.37 -909,-590 -853,-590 v1(-852,-589)
QSPI_IO_3: R20.2 U1.A6 U4.7 | length 1050.5
  Top w4.2: U4.7@-597.7,-565 v1(-557,-565) -382.9,-390.9 -382.9,-364 -382.9,-361.9 -385.36,-359.44 -401.52,-359.44 -402.9,-358.06 -402.9,-351.62 -401.52,-350.24 -377.58,-350.24 -376.2,-348.86 -376.2,-342.42 -377.58,-341.04 -401.52,-341.04 -402.9,-339.66 -402.9,-333.22 -401.52,-331.84 -377.58,-331.84 -376.2,-330.46 -376.2,-324.02 -377.58,-322.64 -401.52,-322.64 -402.9,-321.26 -402.9,-314.82 -401.52,-313.44 -377.58,-313.44 -376.2,-312.06 -376.2,-305.62 -377.58,-304.24 -401.52,-304.24 -402.9,-302.86 -402.9,-296.42 -401.52,-295.04 -377.58,-295.04 -376.2,-293.66 -376.2,-287.22 -377.58,-285.84 -401.52,-285.84 -402.9,-284.46 -402.9,-278.02 -401.52,-276.64 -377.58,-276.64 -376.2,-275.26 -376.2,-268.82 -377.58,-267.44 -388.42,-267.44 -389.8,-266.06 -389.8,-259.62 -388.42,-258.24 -385.36,-258.24 -382.9,-255.78 -382.9,-244 -382.9,-226.87 -375.18,-219.15 -373.69,-217.66 -373.69,-214.18 -376.43,-211.45 -376.43,-209.5 -371.87,-204.94 -369.92,-204.94 -361.71,-213.16 -359.76,-213.16 -355.2,-208.6 -355.2,-206.65 -372.56,-189.29 -372.56,-187.34 -368.01,-182.79 -366.06,-182.79 -348.7,-200.15 -346.74,-200.15 -342.19,-195.59 -342.19,-193.64 -359.55,-176.28 -359.55,-174.33 -355,-169.78 -353.05,-169.78 -335.68,-187.14 -333.73,-187.14 -329.18,-182.58 -329.18,-180.63 -346.54,-163.27 -346.54,-161.32 -341.99,-156.77 -340.04,-156.77 -328.61,-168.19 -325.13,-168.19 -317.47,-160.53 U1.A6@-299.46,-142.52
  Bottom w4.2: R20.2@-591.31,-536 -569,-536 -557,-548 v1(-557,-565)
RXA1_N: C220.2 T1.6 | length 85.5
  Top w9.5: C220.2@1261.58,228.46 1266.67,223.36 1272.05,223.36 1274.21,221.21 1295.11,221.21 1317.36,243.46 T1.6@1334.88,243.46
RXA1_P: C221.2 T1.4 | length 117.2
  Top w9.5: C221.2@1261.58,194.46 1266.67,199.55 1272.05,199.55 1274.21,201.71 1287.8,201.71 1293.65,195.86 1293.65,167.17 1317.36,143.46 T1.4@1334.88,143.46
RXA_N: C220.1 U11.M2 | length 155
  Top w9.5: U11.M2@1166.47,111.44 1166.47,113.24 1172.47,119.24 1172.47,204.22 1189.46,221.21 1209.59,221.21 1211.74,223.36 1217.12,223.36 C220.1@1222.21,228.46
RXA_P: C221.1 U11.M1 | length 122.7
  Top w9.5: U11.M1@1197.97,111.44 1197.97,113.24 1191.97,119.24 1191.97,196.14 1197.54,201.71 1209.59,201.71 1211.74,199.55 1217.12,199.55 C221.1@1222.21,194.46
RXB1_N: C222.2 T2.6 | length 117.5
  Top w9.5: C222.2@1263.08,-320.74 1268.17,-325.84 1273.55,-325.84 1275.71,-327.99 1288.72,-327.99 1293.67,-323.04 1293.67,-292.25 1317.38,-268.54 T2.6@1334.9,-268.54
RXB1_P: C223.2 T2.4 | length 83.5
  Top w9.5: C223.2@1263.08,-354.74 1268.17,-349.65 1273.55,-349.65 1275.71,-347.49 1296.33,-347.49 1317.38,-368.54 T2.4@1334.9,-368.54
RXB_N: C222.1 U11.A1 | length 127.1
  Top w9.5: U11.A1@1197.97,-235.02 1197.97,-236.81 1191.97,-242.81 1191.97,-322.72 1197.24,-327.99 1211.09,-327.99 1213.24,-325.84 1218.62,-325.84 C222.1@1223.71,-320.74
RXB_P: C223.1 U11.A2 | length 159.4
  Top w9.5: U11.A2@1166.47,-235.02 1166.47,-236.81 1172.47,-242.81 1172.47,-330.8 1189.16,-347.49 1211.09,-347.49 1213.24,-349.65 1218.62,-349.65 C223.1@1223.71,-354.74
SD_CLK: R26.1 U5.7 | length 47.2
  Bottom w4.2: U5.7@-1094.68,-541.08 -1094.68,-513.35 -1082.34,-501 R26.1@-1080.37,-501
SD_CMD: U1.C17 U5.6 | length 1530.7
  Top w4.2: v1(-252.21,219.68) U1.C17@-236.46,203.94
  Layer 2 w5: v1(-1099,-461) -1018,-380 -551,-380 -491.5,-320.5 -491.5,-130.5 -455,-94 -455,89 -374.23,169.77 -372.46,171.54 -372.46,175.68 -383.47,186.69 -383.47,188.81 -378.52,193.76 -376.4,193.76 -356.61,173.97 -354.49,173.97 -349.54,178.92 -349.54,181.04 -358.32,189.82 -358.32,191.94 -353.37,196.89 -351.25,196.89 -347.11,196.89 -331,213 -324.91,219.09 -310.91,219.09 -295.82,234.18 -266.71,234.18 v1(-252.21,219.68)
  Bottom w4.2: U5.6@-1114.37,-541.08 -1114.37,-475.37 -1100,-461 v1(-1099,-461)
SD_D0: U1.E12 U5.1 | length 1532.6
  Top w4.2: v1(-189.22,62.2) U1.E12@-173.47,46.46
  Layer 2 w5: v1(-1231.05,-551.73) -1228.07,-551.73 -1217.85,-541.5 -996.29,-541.5 -956,-501.21 -956,-500 -921,-465 -484,-465 -365,-346 -365,-148 -345,-128 -345,-118.63 -298.09,-71.72 -298.09,-46.09 -265.62,-13.62 -263.85,-11.85 -263.85,-7.71 -268.78,-2.77 -268.78,-0.65 -263.83,4.3 -261.71,4.3 -256.78,-0.63 -252.63,-0.63 -243.5,8.5 -235,17 -235,24.49 -235.22,24.7 -235.22,36.71 -224.23,47.7 -203.72,47.7 v1(-189.22,62.2)
  Bottom w4.2: v1(-1231.05,-551.73) -1231.32,-552 -1233,-552 -1232,-553 -1232,-572 -1227.49,-576.51 U5.1@-1208.86,-576.51
SD_D1: U1.A9 U5.3 | length 1530.7
  Top w4.2: v1(-315.2,-63.78) U1.A9@-299.46,-48.03
  Layer 2 w5: v1(-1164,-491) -1164,-493.98 -1173,-502.98 -1173,-523 -1166.07,-529.93 -1138.93,-529.93 -1121,-512 -1015,-512 -954,-451 -498,-451 -385.89,-338.89 -385.89,-267 -385.89,-243.36 -382.96,-240.43 -379.82,-240.43 -378.32,-238.93 -378.32,-231.93 -379.82,-230.43 -404.39,-230.43 -405.89,-228.93 -405.89,-221.93 -404.39,-220.43 -375.5,-220.43 -374,-218.93 -374,-211.93 -375.5,-210.43 -404.39,-210.43 -405.89,-208.93 -405.89,-201.93 -404.39,-200.43 -375.5,-200.43 -374,-198.93 -374,-191.93 -375.5,-190.43 -404.39,-190.43 -405.89,-188.93 -405.89,-181.93 -404.39,-180.43 -375.5,-180.43 -374,-178.93 -374,-171.93 -375.5,-170.43 -393.7,-170.43 -395.2,-168.93 -395.2,-161.93 -393.7,-160.43 -375.5,-160.43 -374,-158.93 -374,-151.93 -375.5,-150.43 -382.96,-150.43 -385.89,-147.5 -385.89,-145 -385.89,-107.89 -341.78,-63.78 v1(-315.2,-63.78)
  Bottom w4.2: U5.3@-1173.43,-541.08 -1173.43,-503.4 -1164,-493.98 v1(-1164,-491)
SD_D2: U1.F13 U5.4 | length 1530.7
  Top w4.2: v1(-157.72,93.7) U1.F13@-141.98,77.95
  Layer 2 w5: v1(-1153,-512) -1152.57,-512 -1138.07,-497.5 -1036.5,-497.5 -975,-436 -513,-436 -418,-341 -418,-170.5 -394.89,-147.39 -394.89,-82 -386.5,-73.61 -386.5,67.5 -345.8,108.2 -172.22,108.2 v1(-157.72,93.7)
  Bottom w4.2: U5.4@-1153.74,-541.08 -1153.37,-540.71 -1153.37,-512.37 v1(-1153,-512)
SD_D3: U1.B15 U5.5 | length 1531.2
  Top w4.2: v1(-283.71,157) -283.71,156.85 -267.96,141.1 U1.B15@-267.96,140.94
  Layer 2 w5: v1(-1132,-483) -1130.57,-483 -1123.57,-476 -1077,-476 -1001,-400 -537,-400 -443,-306 -443,-118 -420,-95 -420,-65 -431,-54 -431,84 -416.31,98.69 -414.54,100.46 -414.54,104.6 -419.55,109.6 -419.55,111.72 -414.6,116.67 -412.48,116.67 -406.46,110.66 -404.34,110.66 -399.39,115.61 -399.39,117.73 -405.41,123.74 -405.41,125.87 -400.46,130.82 -398.34,130.82 -383.18,115.66 -381.06,115.66 -376.11,120.61 -376.11,122.74 -391.26,137.89 -391.26,140.01 -386.32,144.96 -384.19,144.96 -374.79,135.56 -372.67,135.56 -367.72,140.51 -367.72,142.63 -367.98,142.88 -367.98,147.02 -345.75,169.25 -339.5,175.5 -302.52,175.5 -284.02,157 v1(-283.71,157)
  Bottom w5: U5.5@-1134.06,-541.08 -1133.03,-540.05 -1133.03,-484.03 v1(-1132,-483)
TCK: R91.1 R95.1 U1.F9 | length 1237.1
  Top w6: R91.1@-1137.65,-258 -1111,-258 v1(-1110,-258) ; v1(-157.72,-63.78) U1.F9@-141.98,-48.03
  Layer 3 w6: v1(-1110,-258) -1137,-231 -1137,-136.79 -1092.93,-92.72 -893.28,-92.72 -872,-114 -507.28,-114 -486,-92.72 -249.44,-92.72 -237,-80.28 -174.22,-80.28 v1(-157.72,-63.78)
  Bottom w6: R95.1@-1137.65,-258 v1(-1110,-258)
TDI: R92.1 R96.1 U1.G6 | length 1110.8
  Top w4.2: v1@-1111,-226 v1(-1110,-227)
  Top w6: R92.1@-1137.65,-226 v1@-1111,-226 ; v1(-126.23,-158.27) U1.G6@-110.48,-142.52
  Layer 3 w6: v1(-1110,-227) -1032,-149 -470.71,-149 -446.45,-173.27 -141.23,-173.27 v1(-126.23,-158.27)
  Bottom w6: R96.1@-1137.65,-226 -1136.65,-227 v1(-1110,-227)
TDO: R93.1 R97.1 U1.F6 | length 1073.6
  Top w6: R93.1@-1137.65,-194 -1136.65,-195 v1(-1109,-195) ; v1(-157.72,-158.27) U1.F6@-141.98,-142.52
  Layer 3 w6: v1(-1109,-195) -1049.65,-135.65 -491.65,-135.65 -482,-126 -441,-126 -425.23,-141.77 -207.21,-141.77 -190.72,-158.27 v1(-157.72,-158.27)
  Bottom w6: R97.1@-1137.65,-194 -1136.65,-195 v1(-1109,-195)
TMS: R94.1 R98.1 U1.J6 | length 1178.8
  Top w4.2: v1(-63.24,-158) v1@-63.1,-158 ; U1.J6@-47.62,-142.52 U1.J6@-47.49,-142.52
  Top w6: R94.1@-1137.65,-162 -1135.65,-164 v1(-1109,-164) ; v1@-63.1,-158 U1.J6@-47.62,-142.52
  Layer 3 w6: v1(-1109,-164) -1070.65,-125.65 -497.65,-125.65 -478.07,-106.07 -347.93,-106.07 -343.72,-110.28 -184.5,-110.28 -174.22,-120.56 -174.22,-131.49 -163.31,-142.4 -78.84,-142.4 v1(-63.24,-158)
  Bottom w6: R98.1@-1137.65,-162 -1135.65,-164 v1(-1109,-164)
TRIG: R143.2 U1.Y6 | length 83
  Top w4.2: U1.Y6@298.97,-142.52 317.45,-161 R143.2@374.31,-161
TXA1_N: C224.1 T3.6 | length 201.5
  Top w4: C224.1@974.5,249.14 974.5,251.11 982.34,258.95 982.65,258.95 985,261.3 985,360.86 995.68,371.54 995.68,374.85 981.75,388.78 981.75,418.42 T3.6@994.14,430.81
TXA1_P: C225.1 T3.4 | length 201.5
  Top w4: C225.1@1009.5,249.14 1009.5,251.11 1001.65,258.95 1001.34,258.95 999,261.3 999,308.18 999,319.18 cw(c1003.5,319.18) 1003.5,323.68 1004.16,323.68 ccw(c1004.16,328.18) 1004.16,332.68 1003.5,332.68 cw(c1003.5,337.18) 999,337.18 999,347.13 999,355.06 1005.58,361.64 1008.89,361.64 1022.82,347.71 1052.46,347.71 T3.4@1064.85,360.1
TXA_N: C224.2 L8.2 U11.M8 | length 119.9
  Top w4: C224.2@974.5,209.77 974.5,207.8 982.34,199.96 982.65,199.96 985,197.62 985,187.96 982.65,185.62 982.41,185.62 968.66,171.87 L8.2@968.66,169.9 968.66,167.93 982.41,154.18 982.71,154.18 985.05,151.84 985.05,121.8 977.5,114.25 U11.M8@977.5,111.44
TXA_P: C225.2 L9.2 U11.M7 | length 120.9
  Top w4: U11.M7@1008.99,111.44 1008.99,111.86 999.05,121.8 999.05,151.84 1001.39,154.18 1001.69,154.18 1015.44,167.93 L9.2@1015.44,169.9 1015.44,171.87 1001.69,185.62 1001.39,185.62 999,188.01 999,197.62 1001.34,199.96 1001.65,199.96 1009.5,207.8 C225.2@1009.5,209.77
TXB1_N: C229.1 T4.4 | length 200.8
  Top w4: C229.1@977.48,-370.23 977.48,-372.2 985.32,-380.04 985.64,-380.04 987.99,-382.38 987.99,-481.64 995.29,-488.94 995.29,-496.81 981.49,-510.6 981.49,-540.25 T4.4@993.88,-552.63
TXB1_P: C228.1 T4.6 | length 200.8
  Top w4: C228.1@1012.5,-370.23 1012.5,-372.2 1004.65,-380.04 1004.33,-380.04 1001.99,-382.38 1001.99,-429.54 1001.99,-436.85 ccw(c1006.49,-436.85) 1006.49,-441.35 1009.76,-441.35 cw(c1009.76,-445.85) 1009.76,-450.35 1006.49,-450.35 ccw(c1006.49,-454.85) 1001.99,-454.85 1001.99,-465.85 1001.99,-476.7 1004.76,-479.47 1012.62,-479.47 1022.56,-469.54 1052.2,-469.54 T4.6@1064.59,-481.92
TXB_N: C229.2 L11.2 U11.A8 | length 126.4
  Top w4: L11.2@971.76,-291.2 971.76,-289.23 L11.2@982.04,-278.95 ; C229.2@977.48,-330.86 977.48,-328.89 C229.2@985.32,-321.05 ; U11.A8@977.5,-235.02 979.02,-235.02 987.7,-243.7 987.7,-273.29 L11.2@982.04,-278.95 ; C229.2@985.36,-321.05 987.7,-318.7 987.7,-309.11 982.04,-303.45 L11.2@982.04,-278.95
TXB_P: C228.2 L10.2 U11.A7 | length 124.7
  Top w4: U11.A7@1008.99,-235.02 1008.99,-236.41 1001.7,-243.7 1001.7,-273.29 L10.2@1007.36,-278.95 ; C228.2@1012.5,-330.86 1012.5,-328.89 1004.65,-321.05 1004.33,-321.05 1001.7,-318.42 1001.7,-309.11 1007.36,-303.45 L10.2@1007.36,-278.95 ; L10.2@1017.64,-291.2 1017.64,-289.23 L10.2@1007.36,-278.95
UART_RX: R106.1 U1.C8 | length 1423.4
  Top w4.2: v1(-252,-65.03) v1@-251.48,-65.03 ; U1.C8@-236.71,-79.8 U1.C8@-236.2,-79.8
  Top w6: R106.1@-1387.34,200.68 -1386,202.02 v1(-1386,225) ; v1@-251.48,-65.03 U1.C8@-236.71,-79.8
  Layer 3 w6: v1(-1386,225) -1383.49,225 -1377.49,231 -1347.58,231 -1320,203.42 -1320,171 -1270,121 -1240,121 -1201,82 -1201,-6 -1128,-79 -892,-79 -872,-99 -519,-99 -478,-58 -413,-58 -390.28,-80.72 -267.68,-80.72 v1(-252,-65.03)
UART_TX: R105.1 U1.C5 | length 1561.5
  Top w4.2: U1.C5@-236.46,-174.13 U1.C5@-236.46,-174.02
  Top w6: v1(-252.21,-190.2) -252.21,-189.98 -236.46,-174.23 U1.C5@-236.46,-174.13
  Layer 3 w6: v1(-1353.34,200.68) -1353.34,154.34 -1291,92 -1261,92 -1228,59 -1228,-196 -1114,-310 -869,-310 -836,-277 -608,-277 -560,-229 -361.92,-229 -339.19,-206.27 -278,-206.27 -263.65,-191.91 -253.92,-191.91 v1(-252.21,-190.2)
UHSIF_AE#: U1.E17 U24.28 | length 1463.3
  Top w4.2: v1(-858,169) -857.85,169.15 -857.85,207.05 U24.28@-857.7,207.2 ; v1(-189.22,219.68) U1.E17@-173.47,203.94
  Layer 3 w5: v1(-858,169) -858,112 -816,70 -544,70 -482,132 -477.98,136.02 -477.98,140.16 -482.09,144.27 -482.09,146.4 -477.14,151.35 -475.02,151.35 -455.76,132.08 -453.63,132.08 -448.68,137.03 -448.68,139.15 -474.34,164.81 -474.34,166.93 -469.39,171.88 -467.27,171.88 -441.61,146.22 -439.49,146.22 -434.54,151.17 -434.54,153.3 -460.2,178.95 -460.2,181.07 -455.25,186.02 -453.13,186.02 -427.47,160.37 -425.35,160.37 -420.4,165.32 -420.4,167.44 -446.06,193.09 -446.06,195.22 -441.11,200.16 -438.99,200.16 -413.33,174.51 -411.21,174.51 -406.26,179.46 -406.26,181.58 -417.27,192.59 -417.27,196.73 -415.5,198.5 -409,205 -400,205 -388.93,205 -386,207.93 -386,223.5 -384.5,225 -377.5,225 -376,223.5 -376,186.5 -374.5,185 -367.5,185 -366,186.5 -366,223.5 -364.5,225 -357.5,225 -356,223.5 -356,186.5 -354.5,185 -347.5,185 -346,186.5 -346,223.5 -344.5,225 -337.5,225 -336,223.5 -336,186.5 -334.5,185 -327.5,185 -326,186.5 -326,220 -324.5,221.5 -317.5,221.5 -316,220 -316,186.5 -314.5,185 -307.5,185 -306,186.5 -306,221.44 -303.5,223.94 -293.26,234.18 -203.72,234.18 v1(-189.22,219.68)
UHSIF_AF#: U1.F16 U24.26 | length 1463.6
  Top w4.2: U24.26@-889.2,207.2 -888.53,206.53 -888.53,180.96 v1(-887.85,180.29) ; v1(-157.74,188.2) U1.F16@-141.98,172.44
  Layer 3 w5: v1(-887.85,180.29) -887.85,121.85 -825.07,59.07 -753,59.07 -732.93,39 -514,39 -469.5,83.5 -448.98,104.02 -448.98,108.16 -453.52,112.7 -453.52,114.82 -448.57,119.77 -446.45,119.77 -426.76,100.08 -424.63,100.08 -419.68,105.03 -419.68,107.15 -441.7,129.17 -441.7,131.29 -436.75,136.24 -434.63,136.24 -412.61,114.22 -410.49,114.22 -405.54,119.17 -405.54,121.3 -427.56,143.31 -427.56,145.43 -422.61,150.38 -420.49,150.38 -398.47,128.37 -396.35,128.37 -391.4,133.32 -391.4,135.44 -413.41,157.45 -413.41,159.57 -408.46,164.52 -406.34,164.52 -384.33,142.51 -382.21,142.51 -377.26,147.46 -377.26,149.58 -388.27,160.59 -388.27,164.73 -386.5,166.5 -377.5,175.5 -284,175.5 -276.32,175.5 -273.39,178.43 -273.39,178.54 -271.89,180.04 -264.89,180.04 -263.39,178.54 -263.39,157 -261.89,155.5 -254.89,155.5 -253.39,157 -253.39,194 -251.89,195.5 -244.89,195.5 -243.39,194 -243.39,157 -241.89,155.5 -234.89,155.5 -233.39,157 -233.39,194 -231.89,195.5 -224.89,195.5 -223.39,194 -223.39,157 -221.89,155.5 -214.89,155.5 -213.39,157 -213.39,194 -211.89,195.5 -204.89,195.5 -203.39,194 -203.39,172.69 -201.89,171.19 -194.89,171.19 -193.39,172.69 -193.39,194 -191.89,195.5 -184.89,195.5 -183.39,194 -183.39,178.43 -180.46,175.5 -167.96,175.5 -167.5,175.5 -157.74,185.26 v1(-157.74,188.2)